# Altium PCB Inter_board.PcbDoc
Units mil, origin at the board's own origin, x right, y up, seen from the top; angles counter-clockwise.
Board outline 1377.95 x 2165.35 mil, 2 copper layers (Top Layer, Bottom Layer); 49 components, 25 nets, 138 pads, 122 vias.
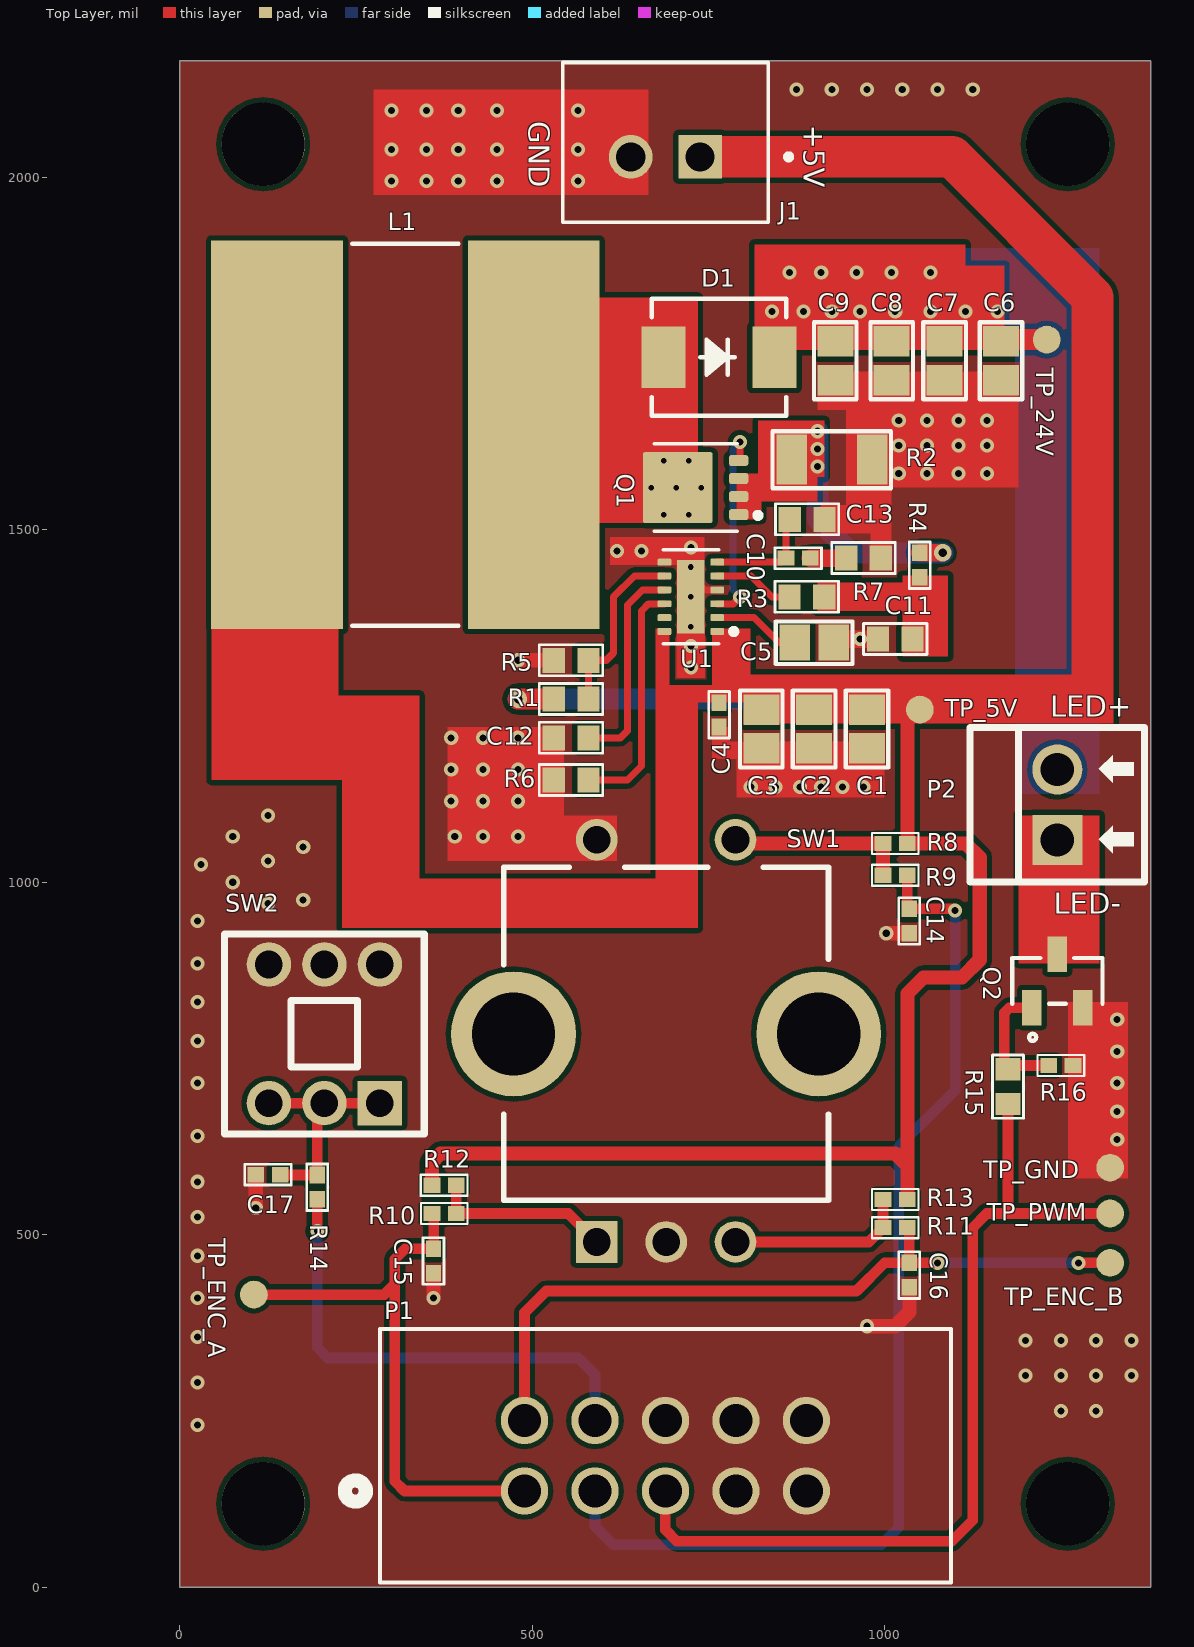
[diagram p0: Top Layer view]
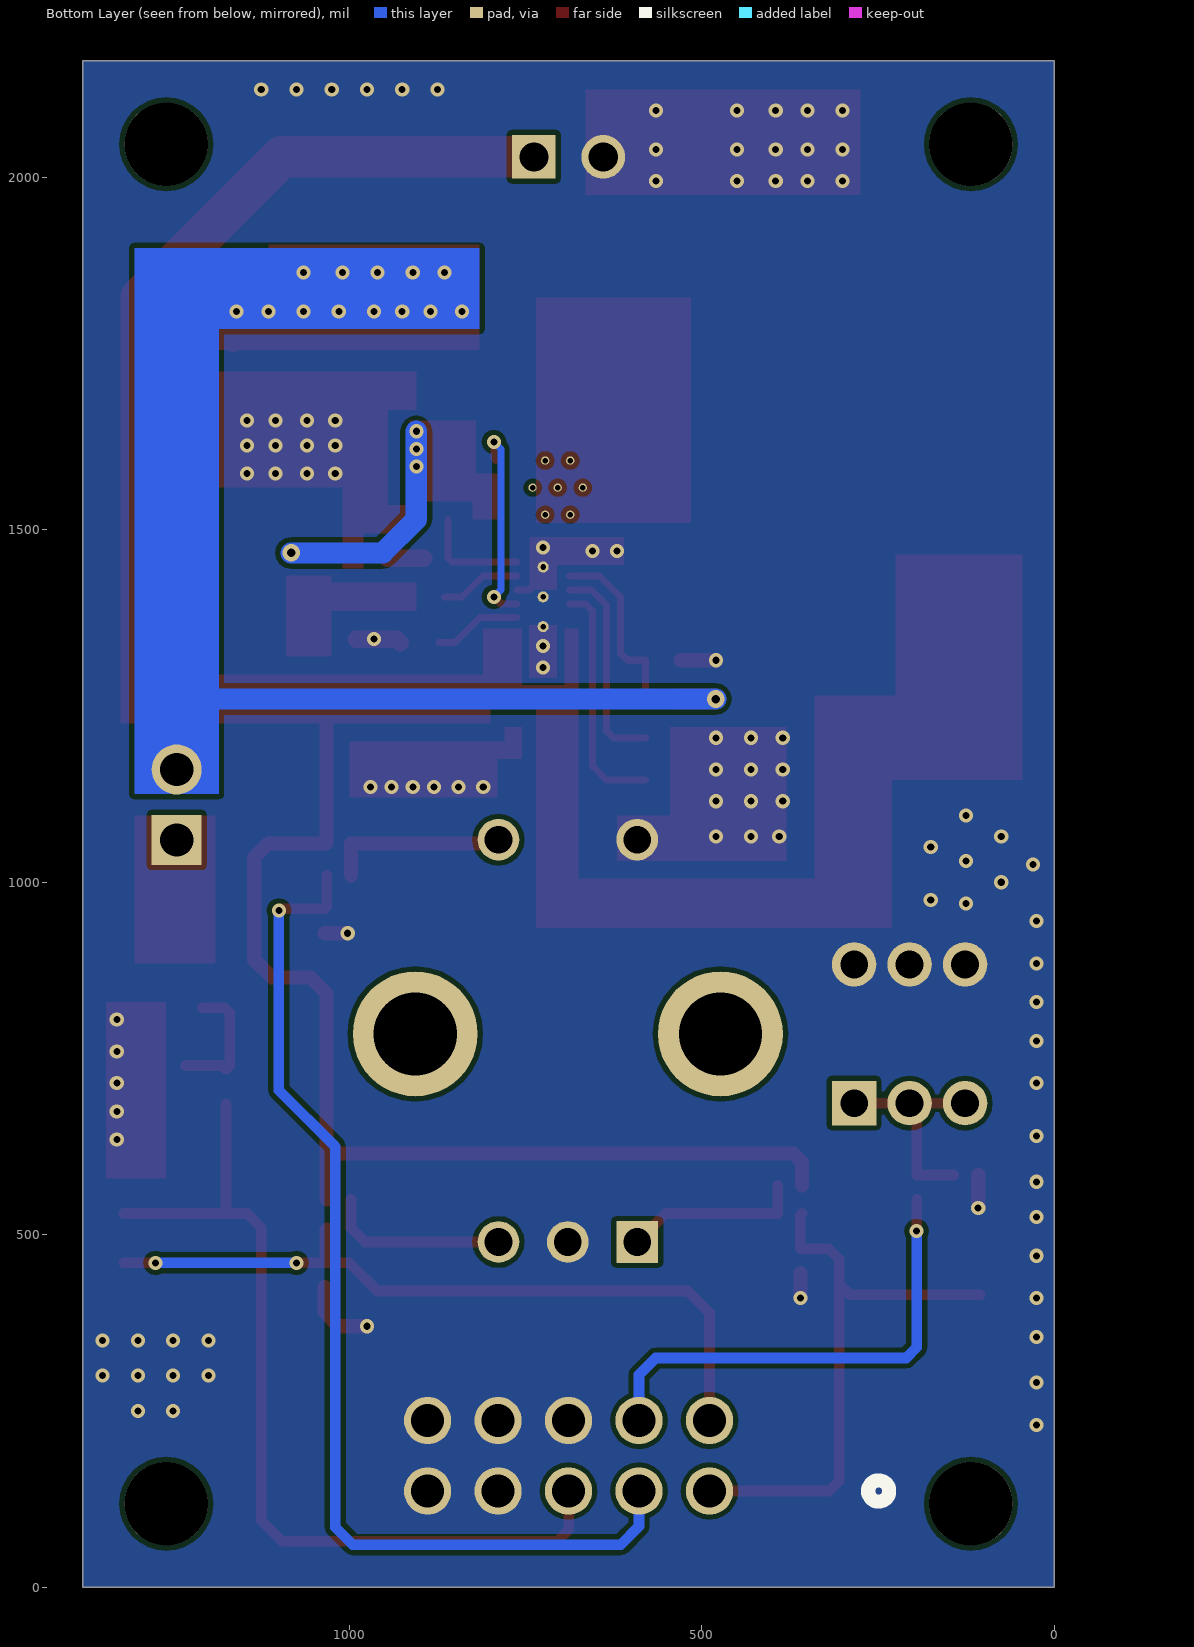
[diagram p1: Bottom Layer view, seen from below]
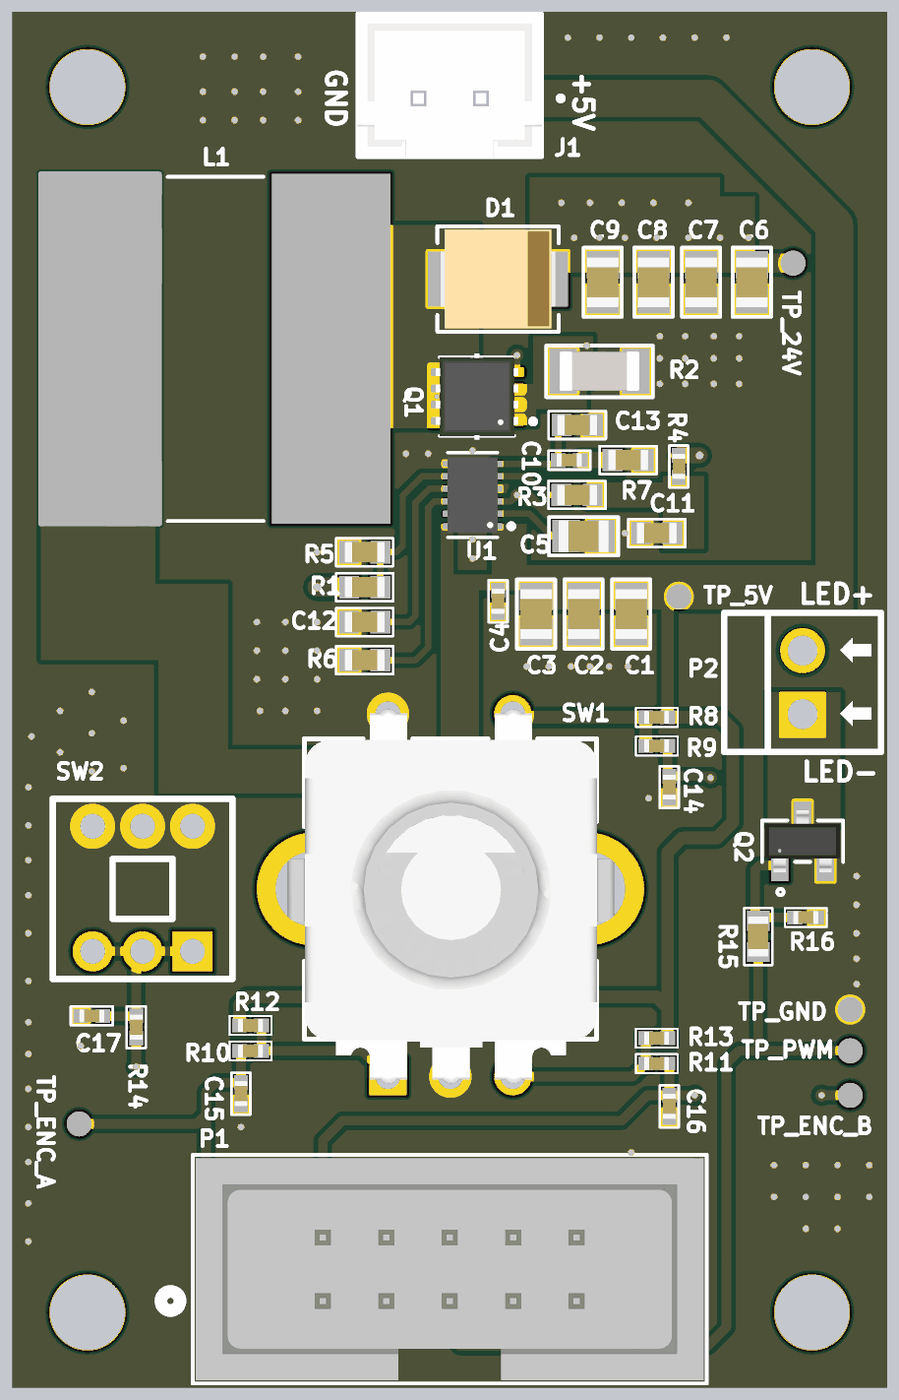
[diagram p2: 3D render of the assembled board from above, using the file's embedded part models]

## Layer stack, top to bottom
Top Solder: solder mask 0.4, Solder Resist, Dk 3.5
Top Layer: signal copper 1.4
Dielectric 1: dielectric 12.6, FR-4, Dk 4.8
Bottom Layer: signal copper 1.4
Bottom Solder: solder mask 0.4, Solder Resist, Dk 3.5

## Board outline
0,0 0,2165.35 1377.95,2165.35 1377.95,0

## Design rules (kind name [scope] priority, off if disabled: settings)
Clearance [All] p1: gap=7 ignorepadtopadclearanceinfootprint=FALSE
HoleSize [All] p1: absolutevalues=TRUE maxlimit=99999 minlimit=1 maxpercent=80.000 minpercent=20.000
MinimumSolderMaskSliver [All] p1: minsoldermaskwidth=0
PolygonConnect [All] p1: connectstyle=Direct reliefconductorwidth=10 reliefentries=4 polygonreliefangle="90 Angle" airgapwidth=8
RoutingVias [All] p1: holewidth=28 width=50 viastyle="Through Hole" minholewidth=10 minwidth=20 maxholewidth=28 maxwidth=50
SilkToSilkClearance [All] p1: silktosilkclearance=1
SilkToSolderMaskClearance [IsPad] p1: minsilkscreentomaskgap=1 clearancetoexposedcopper=TRUE
SolderMaskExpansion [All] p1: expansion=4
Width [All] p1: maxlimit=100 minlimit=10 preferedwidth=10
26 further rules are at their usual default settings.

## Classes and differential pairs
component class "Power Supply": C1 C2 C3 C4 C5 C6 C7 C8 C9 C10 C11 C12 C13 D1 J1 L1 Q1 R1 R2 R3 R4 R5 R6 R7 U1
component class Logic: C14 C15 C16 C17 P1 P2 Q2 R8 R9 R10 R11 R12 R13 R14 R15 R16 SW1 SW2 TP_5V TP_24V TP_ENC_A TP_ENC_B TP_GND TP_PWM

## Components (designator, comment, footprint, x,y, rotation, side; value= is the part's Value field where it differs from the comment)
C1 "10UF" "CAP 0805/2012" 975,1217.56 r270 top
C2 "10UF" "CAP 0805/2012" 900,1217.56 r270 top
C3 "10UF" "CAP 0805/2012" 825,1217.56 r270 top
C4 "100NF" "CAP 0402/1005" 765,1237.56 r270 top value=2.2nF
C5 "1UF" "CAP 0805/2012" 900,1340 r0 top
C6 "10UF" "CAP 0805/2012" 1165,1740 r90 top
C7 "10UF" "CAP 0805/2012" 1085,1740 r90 top
C8 "10UF" "CAP 0805/2012" 1010,1740 r90 top
C9 "1UF" "CAP 0805/2012" 930,1740 r90 top
C10 "100NF" "CAP 0402/1005" 877.32,1460 r180 top value=2.2nF
C11 "1NF" "CAP 0603/1608" 1015,1345 r0 top
C12 "68nF" "CAP 0603/1608" 555,1205 r0 top value=68NF
C13 "56nF" "CAP 0603/1608" 890,1515 r180 top
C14 "100NF" "CAP 0402/1005" 1035,945 r90 top value=2.2nF
C15 "10nF" "CAP 0402/1005" 360,462.68 r90 top
C16 "10nF" "CAP 0402/1005" 1035,442.68 r90 top
C17 "100NF" "CAP 0402/1005" 125,585 r0 top value=2.2nF
D1 "MBRS2040LT3G" CR_40LT3G_ONS 765,1745 r180 top
J1 "B2B-XH-A(LF)(SN)" JST_B2B-XH-A 688.98,2050 r0 top
L1 "SDR1307-4R7ML" IND_BOURNS_SDR1307 320,1635 r180 top
P1 "702461004" CONN_7024610xx_MOL 688.98,186.22 r0 top
P2 "LED_STRIP" LED-STRIP 1245,1110 r90 top
Q1 "CSD18543Q3A" TRANS_CSD18543Q3A 730.81,1560 r180 top
Q2 "Si2318CDS" SOT23 1245,860 r0 top
R1 "57.6K" "CAP 0603/1608" 555,1260 r0 top
R2 "6mR" "CAP 1206/3216" 925,1600 r180 top
R3 "1K" "CAP 0603/1608" 889.61,1405 r0 top
R4 "100R" "CAP 0402/1005" 1050,1450 r90 top
R5 "2.49K" "CAP 0603/1608" 555,1315 r180 top
R6 "48.7K" "CAP 0603/1608" 555,1145 r0 top
R7 "1.65K" "CAP 0603/1608" 970,1460 r180 top
R8 "10K" "RES 0402/1005" 1015,1055 r180 top
R9 "10K" "RES 0402/1005" 1015,1010 r180 top
R10 "10K" "RES 0402/1005" 375,530 r180 top
R11 "10K" "RES 0402/1005" 1015,510 r180 top
R12 "10K" "RES 0402/1005" 375,570 r0 top
R13 "10K" "RES 0402/1005" 1015,550 r180 top
R14 "100R" "CAP 0402/1005" 195,567.32 r90 top
R15 "1K" "CAP 0603/1608" 1175,710 r90 top
R16 "10K" "RES 0402/1005" 1250,740 r180 top
SW1 "EC11E15244B2" EC11E15244B2 690,775 r0 top
SW2 "PS-7054DVB-6PN" SW-TH_6P-L7.0-W7.0-P2.00 205,785 r270 top
TP_5V "" TP_SMD 1050,1245 r90 top
TP_24V "" TP_SMD 1230,1770 r90 top
TP_ENC_A "" TP_SMD 105,415 r90 top
TP_ENC_B "" TP_SMD 1320,460 r90 top
TP_GND "" TP_SMD 1320,595 r90 top
TP_PWM "" TP_SMD 1320,530 r90 top
U1 "LM5155DSSR" IC_LM5155DSSR 725,1405 r180 top

## Footprints (in the part's own frame and the unit in brackets; to place one, negate y for a bottom-side part, rotate by r counter-clockwise, add the part's x,y. Pads: shape width x height; smd on the part's side, far side on the other; paste and mask are expansions set on the pad)
"CAP 0402/1005" [mm] "Chip Capacitor, 2-Leads, Body 1.02x0.51mm, IPC Medium Density"
  rect 0.6x0.55 smd: 1(-0.44,0) 2(0.44,0)
  silkscreen extent -0.84,-0.37 0.84,0.38, body extent -0.5,-0.26 0.5,0.26, height 0.52
"CAP 0603/1608" [mm] "Chip Capacitor, 2-Leads, Body 1.60x0.80mm, IPC High Density"
  rect 0.8x0.9 smd: 1(-0.625,0) 2(0.625,0)
  silkscreen extent -1.14,-0.56 1.14,0.56, body extent -0.8,-0.41 0.8,0.41, height 0.82
"CAP 0805/2012" [mm] "Chip Capacitor, 2-Leads, Body 2.00x1.20mm, IPC High Density"
  rect 1.1x1.3 smd: 1(-0.7,0) 2(0.7,0)
  silkscreen extent -1.39,-0.77 1.39,0.76, body extent -1,-0.64 1,0.64, height 1.26
"CAP 1206/3216" [mm] "Chip Capacitor, 2-Leads, Body 3.25x1.60mm, IPC Medium Density"
  rect 1.1x1.8 smd: 1(-1.45,0) 2(1.45,0)
  silkscreen extent -2.13,-1.02 2.13,1.04, body extent -1.6,-0.8 1.6,0.8, height 0.8
CONN_7024610xx_MOL [mil]
  round 67 / inner round 60 / far side round 67 hole 47 paste-33.5 mask+0: 1(-200,-50) 2(-200,50) 3(-100,-50) 4(-100,50) 5(0,-50) 6(0,50) 7(100,-50) 8(100,50) 9(200,-50) 10(200,50)
  silkscreen extent -455,-180 405,180, body extent -400,-175 400,175, height 376
CR_40LT3G_ONS [mil]
  rect 63x87 smd paste+0 mask+4: 1(-78.74,0) 2(78.74,0)
  silkscreen extent -96,-83 96,83, body extent -91,-78 91,78, height 99
EC11E15244B2 [mm]
  round 4.5 hole 3: 1(-5.5,0.25) 2(5.5,0.25)
  rect 1.5x1.5 hole 1: A1(-2.5,-7.25)
  round 1.5 hole 1: B1(2.5,-7.25) C1(0,-7.25) D1(-2.5,7.25) E1(2.5,7.25)
  silkscreen extent -5.85,-5.75 5.85,6.25, body extent -6.52,-7.52 6.57,7.43, height 24.9
IC_LM5155DSSR [mm]
  rrect40% 0.5x0.25 smd mask+0.05: 1(-0.95,1.25) 2(-0.95,0.75) 3(-0.95,0.25) 4(-0.95,-0.25) 5(-0.95,-0.75) 6(-0.95,-1.25) 7(0.95,-1.25) 8(0.95,-0.75) 9(0.95,-0.25) 10(0.95,0.25) 11(0.95,0.75) 12(0.95,1.25)
  rect 1x2.65 smd paste-2 mask+0.05: 13(0,0)
  round 0.4 hole 0.2 mask+0: 14(0,1.075) 15(0,0) 16(0,-1.075)
  silkscreen extent -1.65,-1.7 1,1.7, body extent -1,-1.5 1,1.5, height 0.8
IND_BOURNS_SDR1307 [mil]
  rect 187x551 smd paste+0 mask+4: 1(-182,0)
  rect 187x551 smd paste+4 mask+0: 2(182,0)
  silkscreen extent -75,-271 75,271
JST_B2B-XH-A [mm]
  rect 1.575x1.575 / inner round 1.575 / far side rect 1.575x1.575 hole 1.05: 1(1.25,-0.525)
  round 1.575 hole 1.05: 2(-1.25,-0.525)
  silkscreen extent -3.7,-2.88 4.54,2.88, body extent -3.7,-2.88 3.7,2.88, height 7
LED-STRIP [mm]
  rect 1.8x1.8 hole 1.2 paste+0 mask+0.051: 1(-1.27,0)
  round 1.8 hole 1.2 paste+0 mask+0.051: 2(1.27,0)
  silkscreen extent -2.78,-3.14 2.78,3.14
"RES 0402/1005" [mm] "Chip Resistor, 2-Leads, Body 1.0x0.5mm, IPC Medium Density"
  rect 0.6x0.55 smd: 1(-0.44,0) 2(0.44,0)
  silkscreen extent -0.84,-0.37 0.84,0.38, body extent -0.5,-0.26 0.5,0.26, height 0.52
SOT23 [mm]
  rect 0.7x1.27 smd paste+0 mask+0.102: 1(-0.915,-0.965) 2(0.915,-0.965) 3(0,0.965)
  silkscreen extent -1.63,-2.16 1.63,0.83, body extent -1.5,-1.24 1.5,1.24, height 1.09
SW-TH_6P-L7.0-W7.0-P2.00 [mm]
  rect 1.6x1.6 hole 1 mask+0.102: 1(2.5,2)
  round 1.6 hole 1 mask+0.102: 2(2.5,0) 3(2.5,-2) 4(-2.5,2) 5(-2.5,0) 6(-2.5,-2)
  silkscreen extent -3.6,-3.6 3.61,3.6
TP_SMD [mm]
  round 1 smd: 1(0,0)
TRANS_CSD18543Q3A [mm]
  rrect50% 0.7x0.4 smd paste-1: 1(-1.576,0.975) 2(-1.576,0.325) 3(-1.576,-0.325) 4(-1.576,-0.975)
  rrect5% 2.51x2.55 smd paste-2: 5(0.619,0)
  round 0.3 hole 0.2: 6(0.219,0.975) 7(1.124,0.975) 8(-0.233,0) 9(0.671,0) 10(1.576,0) 11(0.219,-0.975) 12(1.124,-0.975)
  silkscreen extent -2.37,-1.58 1.47,1.58, body extent -1.68,-1.73 1.62,1.73, height 0.9

## Part data
C1 C2 C3 C6 C7 C8: "CAP CER 10uF 50V X5R 0805", Manufacturer=muRata, MPN=GRM21BR61H106KE43L, Operating Temperature="-55°C ~ 125°C", Package=0805, SPN=C440198, Supplier=LCSC
C4 C10 C14 C17: "50V 100nF X7R ±10% 0402 Multilayer Ceramic Capacitors MLCC - SMD/SMT ROHS", Manufacturer=muRata, MPN=GRM155R71H104KE14D, Operating Temperature="-55°C ~ 125°C", Package="0402 (1005 Metric)", SPN=C77020, Supplier=LCSC
C5 C9: "CAP CER 1uF 50V X7R 0805", Manufacturer="Samsung Electro-Mechanics", Manufacturer Part Number=CL21B105KBFNNNE, Package=0805, Supplier Part Number=C28323, Supplier=LCSC
C11: "CAP CER 1nF 50V X7R 0603", Manufacturer="Samsung Electro-Mechanics", MPN=CL10B102KB8NNNC, Operating Temperature="-55°C ~ 125°C", Package=0603, SPN=C1588, Supplier=LCSC
C12: "CAP CER 68nF 50V X7R 0603", Manufacturer=YAGEO, Manufacturer Part Number=CC0603KRX7R9BB683, Package=0603, Supplier Part Number=C107098, Supplier=LCSC
C13: "CAP CER 56nF 50V X7R 0603", Manufacturer=YAGEO, Manufacturer Part Number=CC0603KRX7R9BB563, Package=0603, Supplier Part Number=C282072, Supplier=LCSC
C15 C16: "50V 10nF X7R ±10% 0402 Multilayer Ceramic Capacitors MLCC - SMD/SMT ROHS", Manufacturer=YAGEO, MPN=CC0402KRX7R9BB103, Operating Temperature="-55°C ~ 125°C", Package="0402 (1005 Metric)", SPN=C60133, Supplier=LCSC
D1: "DIODE SCHOTTKY 40V SMB(DO-214AA)", Manufacturer_Name=onsemi, Package=SMB(DO-214AA), Manufacturer_Part_Number=MBRS2040LT3G, SPN=C59626
J1: library part B2B-XH-A, "Through Hole,P=2.5mm", MF=JST, MP=B2B-XH-A(LF)(SN), SPN=C158012
L1: "FIXED IND 4.7uH 7A 10mO SMD,13x13mm", LCSC=C2046624, Manufacturer="Bourns Electronics", Package=SMD,13x13mm, Manufacturer_Part_Number=SDR1307-4R7ML
P1: library part "Header 5X2", "-55?~+120? 10P 2 2.54mm 2.5A 250V 2x5P 5 Brass Gold Through Hole UL94V-0 Plugin,P=2.54mm Wire To Board Connector ROHS", MF=MOLEX, MPN=702461004, SPN=C588426
P2: "Through Hole,P=2.54mm", Manufacturer=DORABO, Manufacturer Part Number=DB125-2.54-2P-GN-S, Package=TH, Supplier Part Number=C918120, Supplier=LCSC
Q1: "60-V, N channel NexFET™ power MOSFET, single SON 3 mm x 3 mm, 9.9 mOhm", Package=VSONP-8, MF="Texas Instruments", MPN=CSD18543Q3A, SPN=C840100
Q2: "MOSFET N-CH 40V 5.6A SOT-23", Manufacturer=VISHAY, Manufacturer Part Number=Si2318CDS-T1-GE3, Package=SOT-23, Supplier Part Number=C14498, Supplier=LCSC
R1: "RES 57.6kO ±1% 100mW 0603", Manufacturer=YAGEO, MPN=RC0603FR-0757K6L, Operating Temperature="-55°C ~ 155°C", Package=0603, SPN=C245983, Supplier=LCSC, Supplier Availability=Active
R2: "RES 6mO ±1% 1W 1206", Manufacturer=prosemi, Manufacturer Part Number=MSR12A1R006F2, Package=1206, Supplier Part Number=C21261095, Temperature="-55 to 155", Supplier=LCSC
R3 R15: library part 1K-0603, "RES 1kO ±1% 100mW 0603", Manufacturer=YAGEO, Manufacturer Part Number=RC0603FR-071KL, Operating Temperature="-55°C ~ 155°C", Package=0603, Supplier Part Number=C22548, Supplier=LCSC, Supplier Availability=Active
R4 R14: library part 100R/0402, "RES 100O ±1% 62.5mW 0402", Manufacturer=Yageo, Manufacturer Part Number=RC0402FR-07100RL, Package=0402, Supplier Part Number=C106232, Temperature="-55 to 155", Supplier=LCSC
R5: "RES 2.49kO ±1% 100mW 0603", Manufacturer=FOJAN, MPN=FRC0603F2491TS, Operating Temperature="-55°C ~ 155°C", Package=0603, SPN=C2930072, Supplier=LCSC, Supplier Availability=Active
R6: "RES 48.7kO ±1% 100mW 0603", Manufacturer=FOJAN, Manufacturer Part Number=FRC0603F4872TS, Operating Temperature="-55°C ~ 155°C", Package=0603, Supplier Part Number=C2933226, Supplier=LCSC, Supplier Availability=Active
R7: "RES 1.65kO ±1% 100mW 0603", Manufacturer=FOJAN, Manufacturer Part Number=FRC0603F1651TS, Operating Temperature="-55°C ~ 155°C", Package=06-3, Supplier Part Number=C2930051, Supplier=LCSC, Supplier Availability=Active
R8 R9 R10 R11 R12 R13 R16: "62.5mW Thick Film Resistors 50V ±1% 10kO 0402 Chip Resistor - Surface Mount ROHS", Manufacturer=VO, MPN=SCR0402F10K, Operating Temperature="-55°C ~ 155°C", Package="0402 (1005 Metric)", SPN=C3015825, Supplier=LCSC, Supplier Availability=Active
SW1: "Through Hole Encoders RoHS", LCSC=C470754, MF="ALPS Electric", MPN=EC11E15244B2, Package=https://tech.alpsalpine.com/e/products/detail/EC11E15244B2/
SW2: "SWITCH PUSH 500mA 24V", Package=6P,7x7mm, MF=G-Switch(??), MPN=PS-7054DVB-6PN, SPN=C22363820, Supplier=LCSC
TP_5V TP_24V TP_ENC_A TP_ENC_B TP_GND TP_PWM: library part TP-SMD, "Test Pin"
U1: "2.2-MHz wide VIN, 1.5-A MOSFET driver, non-synchronous boost controller", Package="WSON-12 Texas Instruments", MF="Texas Instruments", MPN=LM5155DSSR, SPN=C545416

## Free pads (board coordinates)
  round 118.11 hole 118.11 mask+4: MH(118.11,118.11) MH(118.11,2047.24) MH(1259.84,118.11) MH(1259.84,2047.24)

## Via types
v1: diameter 20, hole 10, Top Layer to Bottom Layer, tented both sides, 120 vias
v2: diameter 25, hole 12, Top Layer to Bottom Layer, tented both sides, 2 vias

## Nets (pads, with @x,y where several pads share a name; then routed paths per layer and width w, separated by ;. In a path a pad name is that pad's centre, name@x,y a point inside that pad or via, vN(x,y) a via of type N, cw(c..) or ccw(c..) an arc to the next point about the centre after c; other vN are vias at no path point)
+5V: C1.1 C2.1 C3.1 C4.1 J1.1 L1.2 R8.1 R12.1 R13.1 TP_5V.1 U1.1 U1.12 | length 3269.8
  Top Layer w20: R12.1 357.68,602.68 370,615 1015,615 1032.32,597.68 ; 1030,1255 1032.32,1252.68 R8.1 1115,1055 1135,1035 1135,890 1110,865 1055,865 1032.32,842.32 1032.32,597.68 ; R13.1 1032.32,597.68
  Top Layer w59.06: J1.1 1095.67,2029.33 1295,1830 1295,1255 1030,1255 C3.1@830.82,1255
+24V: C6.2 C7.2 C8.2 C9.2 D1.1 P2.2 R1.1 TP_24V.1 | length 856.4
  Top Layer w30: v2(480,1260) R1.1 ; C6.2 1167.44,1770 TP_24V.1
  Bottom Layer w30: v2(480,1260) 1220,1260
  other v1: 840,1810 885,1810 925,1810 965,1810 1015,1810 1065,1810 1115,1810 1160,1810 865,1865 910,1865 960,1865 1010,1865 1065,1865
GND: C1.2 C2.2 C3.2 C4.2 C5.2 C6.1 C7.1 C8.1 C9.1 C11.1 C12.1 C13.1 C14.1 C15.1 C16.1 C17.1 J1.2 P1.6 P1.7 P1.8 P1.9 P1.10 Q2.2 R2.1 R5.2 R6.1 R7.1 R16.1 SW1.C1 SW1.D1 SW2.4 SW2.5 SW2.6 TP_GND.1 U1.4 U1.7 U1.13 U1.14 U1.15 U1.16 | length 359
  Top Layer w10: U1.13@739.76,1419.76 744.68,1414.84 U1.4
  Top Layer w20: v1(107.68,537.68) C17.1 ; v1(360,410) C15.1 ; v1(480,1315) R5.2 ; v1(975,370) 1015,370 1035,390 C16.1 ; v1(1002.32,927.68) C14.1
  Top Layer w25: C5.2 932.56,1345 C11.1
  other v1: 25,230 1250,250 1300,250 25,290 1200,300 1250,300 1300,300 1350,300 1200,350 1250,350 1300,350 1350,350 25,355 25,410 25,470 25,525 25,575 1330,635 25,640 1330,675 25,715 1330,715 1330,760 25,775 1330,805 25,830 25,885 25,945 125,970 175,975 75,1000 30,1025 125,1030 175,1050 75,1065 390,1065 430,1065 480,1065 125,1095 385,1115 430,1115 480,1115 810,1135 845,1135 880,1135 910,1135 940,1135 970,1135 385,1160 430,1160 480,1160 385,1205 430,1205 480,1205 725,1305 725,1335 965,1345 620,1470 655,1470 725,1475 1020,1580 1060,1580 1105,1580 1145,1580 1020,1620 1060,1620 1105,1620 1145,1620 1020,1655 1060,1655 1105,1655 1145,1655 300,1995 350,1995 395,1995 450,1995 565,1995 300,2040 350,2040 395,2040 450,2040 565,2040 300,2095 350,2095 395,2095 450,2095 565,2095 875,2125 925,2125 975,2125 1025,2125 1075,2125 1125,2125
"GPIO (BUTTON SIGNAL)": C14.2 P1.3 R9.1 | length 1525.2
  Top Layer w15: R9.1 1032.32,965 C14.2 1097.68,962.32 v1(1100,960)
  Bottom Layer w15: P1.3 588.98,86.02 615,60 995,60 1020,85 1020,625 1100,705 v1(1100,960)
"GPIO (CLK)": C15.2 P1.1 R10.2 TP_ENC_A.1 | length 823.1
  Top Layer w15: TP_ENC_A.1 290,415 305,430 ; R10.2 360,527.68 C15.2 320,480 305,465 305,430 ; P1.1 318.78,136.22 305,150 305,430
"GPIO (DT)": C16.2 P1.2 R11.1 TP_ENC_B.1 | length 1064.3
  Top Layer w15: P1.2 488.98,388.98 520,420 960,420 1000,460 C16.2 ; R11.1 1035,507.32 C16.2 ; v1(1075,460) C16.2 ; v1(1275,460) TP_ENC_B.1
  Bottom Layer w15: v1(1075,460) v1(1275,460)
"GPIO (PHOTO BTN)": P1.4 R14.1 | length 684.9
  Top Layer w15: v1(195,505) R14.1
  Bottom Layer w15: v1(195,505) 195,340 210,325 565,325 588.98,301.02 P1.4
"GPIO (PWM, Raspberry PI)": P1.5 R15.1 TP_PWM.1 | length 1286
  Top Layer w15: P1.5 688.98,81.02 705,65 1095,65 1125,95 1125,510 1145,530 1180,530 ; R15.1 1175,535 1180,530 ; TP_PWM.1 1180,530
NetC5_1: C5.1 U1.2 | length 124.7
  Top Layer w10: U1.2 814.53,1375.47 850,1340 C5.1
NetC10_1: C10.1 R7.2 | length 50.7
  Top Layer w25: C10.1 R7.2
NetC10_2: C10.2 C13.2 U1.6 | length 155
  Top Layer w10: U1.6 854.21,1454.21 C10.2 C13.2@860,1515
NetC11_2: C11.2 R3.2 R4.1
NetC12_2: C12.2 U1.9 | length 299.3
  Top Layer w10: C12.2 625,1205 635,1215 635,1393.28 656.56,1414.84 U1.9
NetC17_2: C17.2 R14.2 SW2.1 SW2.2 SW2.3 | length 316.4
  Top Layer w15: SW2.3 SW2.2 ; C17.2 142.68,584.65 R14.2 195,676.57 SW2.2 ; SW2.1 SW2.2
NetD1_2: D1.2 L1.1 Q1.5 Q1.6 Q1.7 Q1.8 Q1.9 Q1.10 Q1.11 Q1.12
NetP2_1: P2.1 Q2.3
NetQ1_1: Q1.1 Q1.2 Q1.3 R2.2 R4.2 | length 355.1
  Top Layer w25: R4.2 v2(1082.68,1467.32)
  Bottom Layer w30: v1(905,1640) 905,1515 952.68,1467.32 v2(1082.68,1467.32)
  other v1: 905,1590 905,1615
NetQ1_4: Q1.4 U1.3 | length 292.5
  Top Layer w10: U1.3 785.16,1395.16 v1(795,1405) ; Q1.4 795,1600.51 v1(795,1625)
  Bottom Layer w10: v1(795,1405) 785,1415 785,1615 v1(795,1625)
NetQ2_1: Q2.1 R15.2 R16.2 | length 184.3
  Top Layer w15: Q2.1 1177,822 1170,815 1170,739.61 R15.2 1180.39,740 R16.2
NetR1_2: R1.2 R5.1 U1.8 | length 259.1
  Top Layer w10: R1.2 R5.1 605,1315 615,1325 615,1404.53 645,1434.53 U1.8
NetR3_1: R3.1 U1.5 | length 114.8
  Top Layer w10: U1.5 810.47,1434.53 840,1405 R3.1
NetR6_2: R6.2 U1.10 | length 340.5
  Top Layer w10: R6.2 635,1145 655,1165 655,1385 665.16,1395.16 U1.10
NetR8_2: R8.2 R9.2 SW1.E1 | length 256.5
  Top Layer w20: SW1.E1 793.86,1055 R8.2 R9.2
NetR10_1: R10.1 R12.2 SW1.A1 | length 256
  Top Layer w15: R12.2 R10.1 551.14,530 SW1.A1
NetR11_2: R11.2 R13.2 SW1.B1 | length 257.7
  Top Layer w15: SW1.B1 977.24,489.57 R11.2 R13.2
pads on no net: SW1.1 SW1.2 U1.11

## Polygon pours and split planes (outlines as drawn)
GND on Top Layer "TopLayer-No Net" (solid, pour order 0): 0,0 0,2165.35 1377.95,2165.35 1377.95,0
GND on Bottom Layer "TopLayer-No Net" (solid, pour order 2): 0,0 0,2165.35 1377.95,2165.35 1377.95,0

## Other copper
Top Layer:
  rectangle net GND: 275,1975 665,2125
  rectangle net GND: 445,1030 620,1095
  rectangle net GND: 380,1030 545,1220
  rectangle net GND: 705,1290 745,1365
  rectangle net GND: 610,1450 744.68,1490
  rectangle net GND: 705,1414.84 744.68,1490
  rectangle net GND: 755,1175 805,1200
  rectangle net GND: 755,1175 780,1220
  rectangle net GND: 790,1120 1000,1200
  rectangle net GND: 1260,580 1345,830
  rectangle net NetP2_1: 1190,885 1305,1095
  rectangle net +5V: 45,1145 225,1465
  rectangle net +5V: 45,1145 340,1265
  rectangle net +5V: 230,935 340,1265
  rectangle net +5V: 230,935 735,1005
  rectangle net +5V: 675,935 735,1270
  rectangle net +24V: 815,1845 1115,1905
  rectangle net NetC11_2: 905,1385 1045,1425
  rectangle net NetC11_2: 1025,1320 1090,1435
  rectangle net NetQ1_1: 820,1575 915,1655
  rectangle net NetQ1_1: 805,1540 905,1580
  rectangle net NetQ1_1: 790,1515 825,1580
  rectangle net +5V: 680,1254.88 780,1280
  rectangle net +5V: 675,1254.88 695,1360
  rectangle net +5V: 755,1255 810,1360
  rectangle net +5V: 800,1225 1325,1295
  rectangle net +24V: 815,1755 1170,1875
  rectangle net GND: 980,1445 1010,1585
  rectangle net GND: 945,1495 985,1675
  rectangle net GND: 910,1495 985,1535
  rectangle net GND: 945,1560 1190,1675
  rectangle net GND: 905,1670 1190,1725
  rectangle net NetD1_2: 515,1510 735,1830
Bottom Layer:
  rectangle net +24V: 815,1785 1305,1900
  rectangle net +24V: 1185,1125 1305,1880

## Silkscreen, mask and mechanical layers (free items; w line width, h text height)
Top Overlay:
  text "GND" at 495,2080 h30 r270
  text "+5V" at 885,2075 h30 r270
  text "LED+" at 1235,1235 h30
  text "LED-" at 1240,955 h30
Mechanical 1:
  the board outline again, w10